# Altium PCB PCI Express_16765X6890_64PIN_Low profile_Clear.PCBDOC (part 6 of 9)
Units mm, origin at the board's own origin, x right, y up, seen from the top; angles counter-clockwise.
Board outline 80.71 x 137.84 mm, 6 copper layers (Top Layer, Layer 2 (GND), Layer 3, Layer 4, Layer 5 (AGND), Bottom Layer), stack 1.571 mm thick; 507 components, 297 nets, 1544 pads, 616 vias.
Unrouted connection lines stored in the file: 101.
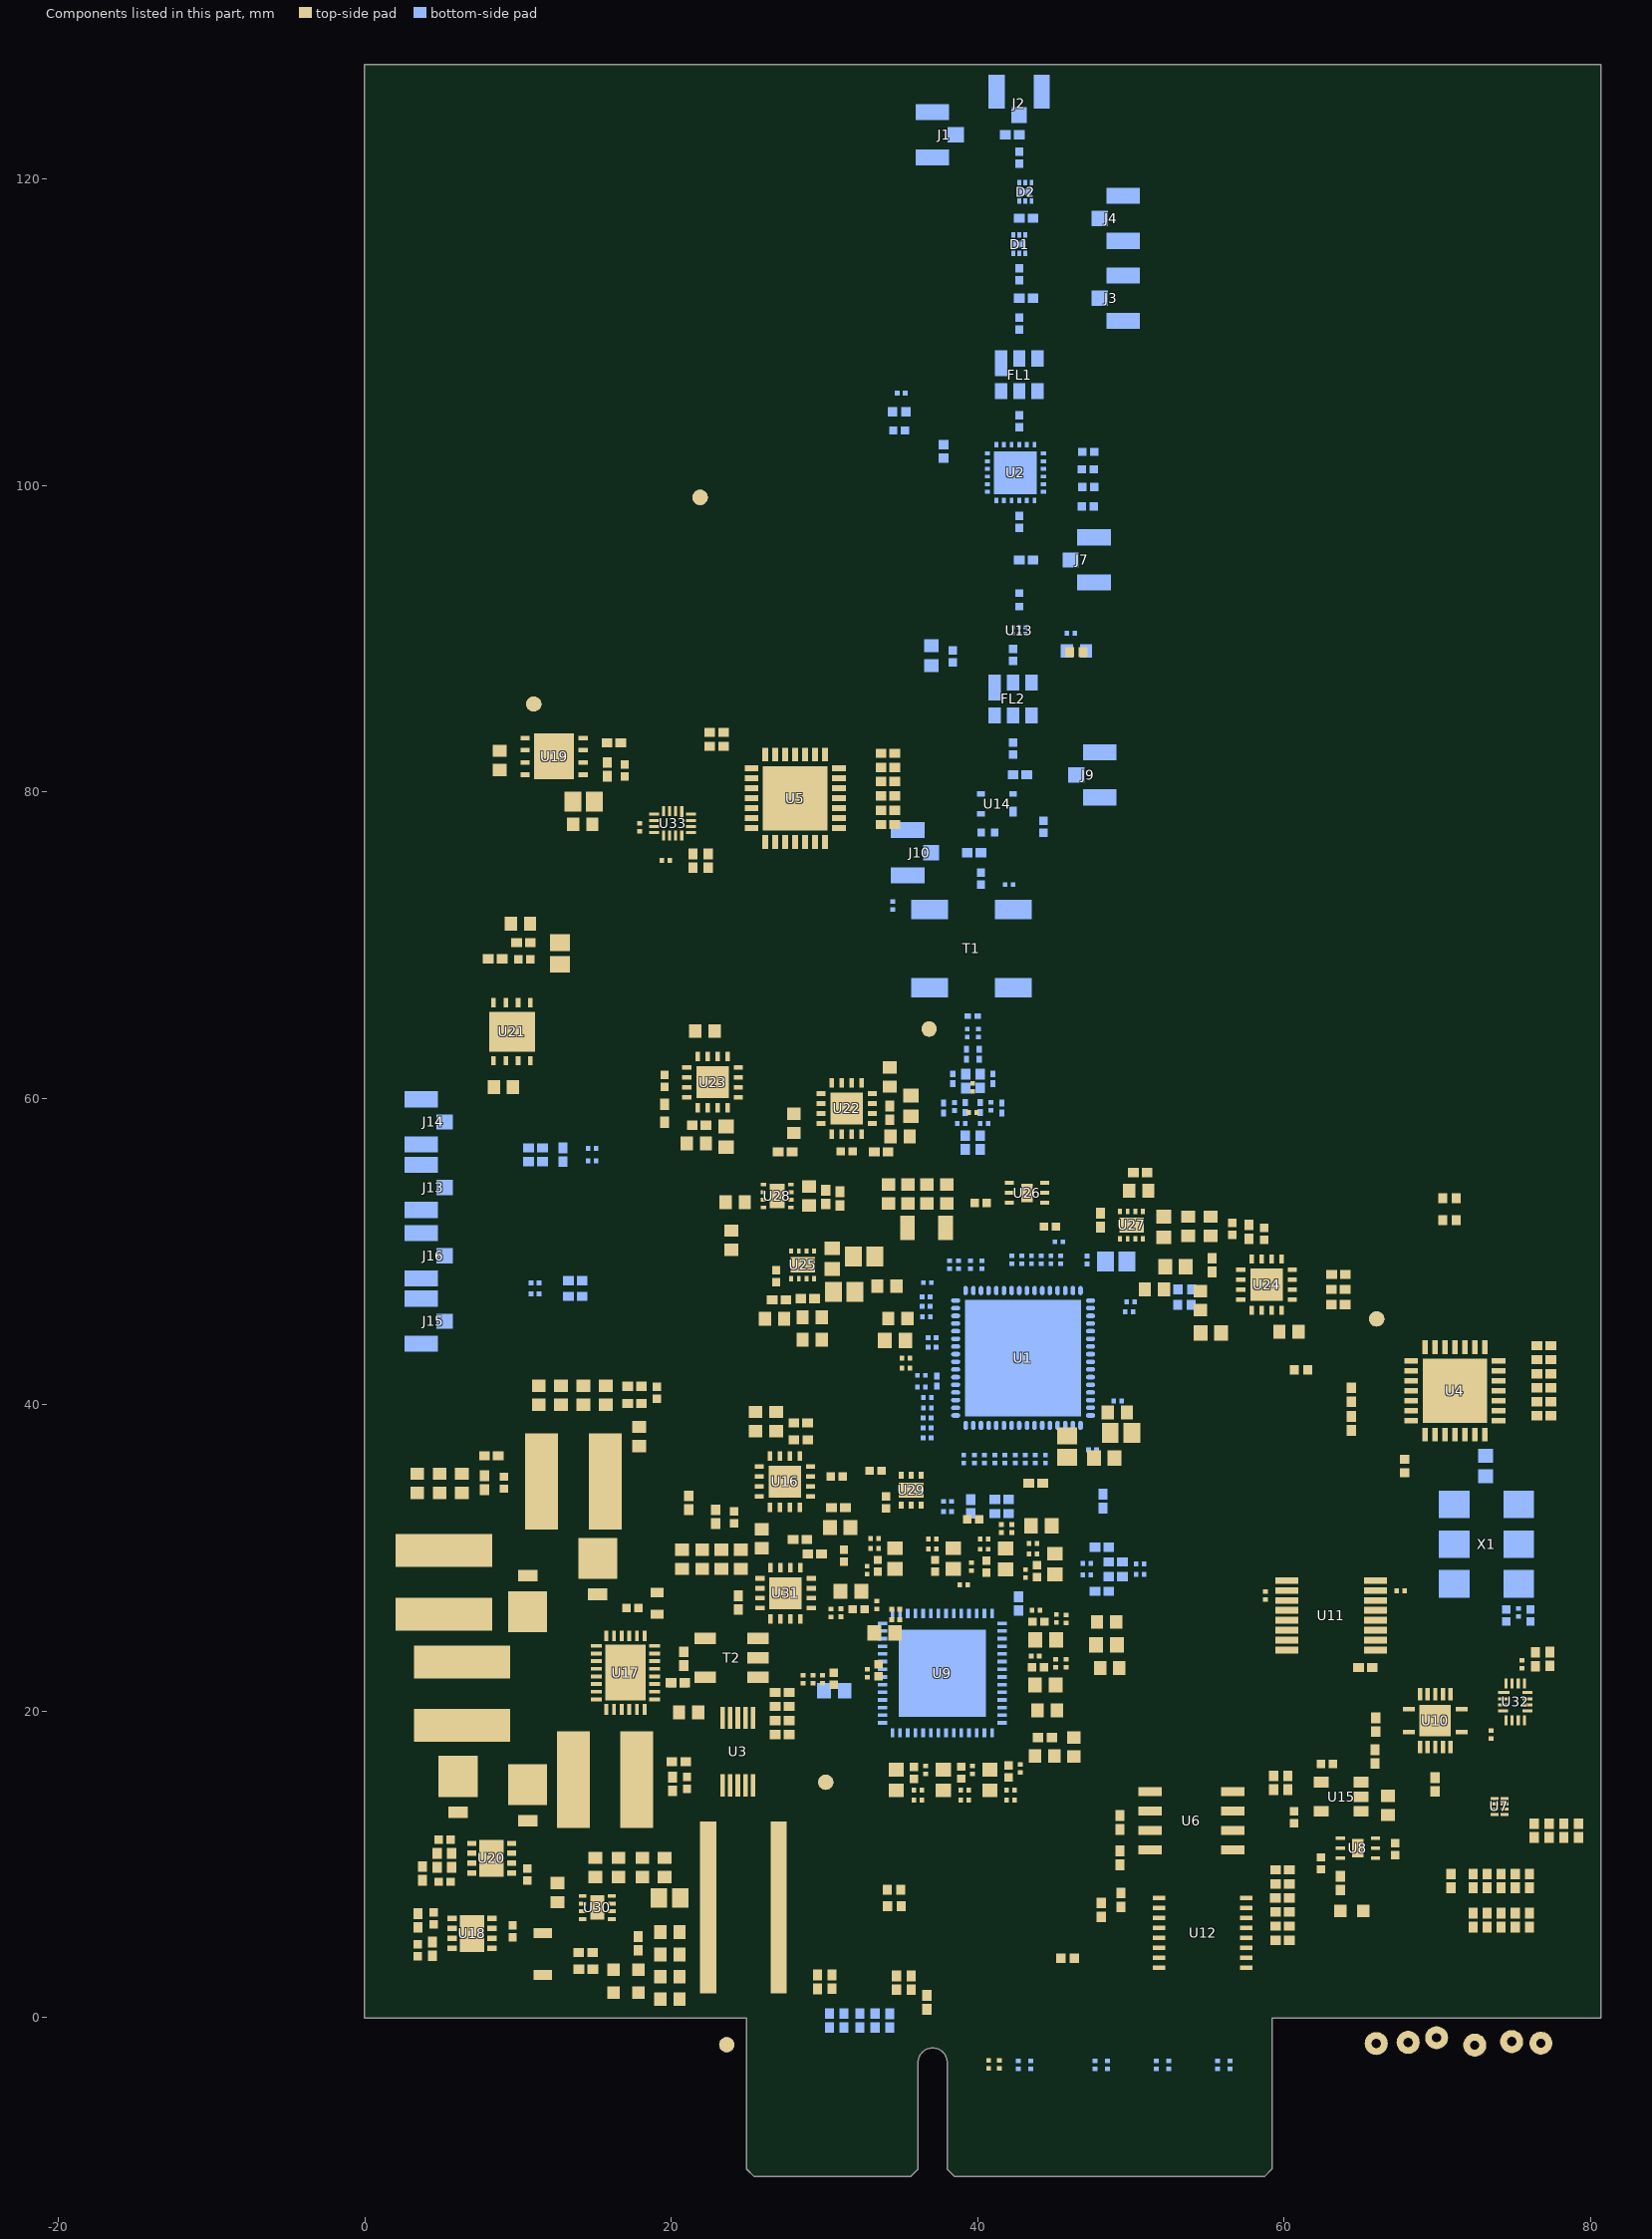
[diagram p4: the components of this part, seen from the top]

## Part data (continued)
U7: "TEXAS INSTRUMENTS   PCA9306DQER.   IC, SMBus, 5V, X2SON-8", Low Level Output Current=128mA, Manufacturer 1="Texas Instruments", Max Operating Temperature=85°C, Max Supply Voltage=5V, Min Operating Temperature=-40°C, Min Supply Voltage=0uV, Package Quantity=1, Supplier Part Number 1=296-27957-1-ND, ComponentLink1Description=https://datasheet.ciiva.com/22631/1719693-22631024.pdf?src-supplier=Element14, ComponentLink1URL=https://datasheet.ciiva.com/22631/1719693-22631024.pdf?src-supplier=Element14, ComponentLink2Description=https://datasheet.ciiva.com/1899/pca9306-1899328.pdf?src-supplier=Digi-Key, ComponentLink2URL=https://datasheet.ciiva.com/1899/pca9306-1899328.pdf?src-supplier=Digi-Key, ComponentLink3Description=https://datasheet.ciiva.com/15095/getdatasheetpartid-306496-15095555.pdf?src-supplier=Verical, ComponentLink3URL=https://datasheet.ciiva.com/15095/getdatasheetpartid-306496-15095555.pdf?src-supplier=Verical, ComponentLink4Description=https://datasheet.ciiva.com/1504/1862428-1504149.pdf?src-supplier=Element14, ComponentLink4URL=https://datasheet.ciiva.com/1504/1862428-1504149.pdf?src-supplier=Element14, ComponentLink5Description=https://datasheet.ciiva.com/1899/pca9306-1899326.pdf?src-supplier=Digi-Key, ComponentLink5URL=https://datasheet.ciiva.com/1899/pca9306-1899326.pdf?src-supplier=Digi-Key, ComponentLink6Description=https://datasheet.ciiva.com/14287/pca9306-14287374.pdf?src-supplier=Avnet, ComponentLink6URL=https://datasheet.ciiva.com/14287/pca9306-14287374.pdf?src-supplier=Avnet, ComponentLink7Description=https://datasheet.ciiva.com/14287/pca9306-14287470.pdf?src-supplier=Avnet, ComponentLink7URL=https://datasheet.ciiva.com/14287/pca9306-14287470.pdf?src-supplier=Avnet, ComponentLink8Description=https://datasheet.ciiva.com/1899/pca9306-1899327.pdf?src-supplier=Digi-Key, ComponentLink8URL=https://datasheet.ciiva.com/1899/pca9306-1899327.pdf?src-supplier=Digi-Key, ComponentLink9Description=https://datasheet.ciiva.com/26041/pca9306-26041014.pdf?src-supplier=Avnet+Europe, ComponentLink9URL=https://datasheet.ciiva.com/26041/pca9306-26041014.pdf?src-supplier=Avnet+Europe, Height=0.35mm, Lead Free="Lead Free", Length=1.45mm, Logic Function=Translator, Manufacturer Part Number 1=PCA9306DQER, Number of Bits=2, Number of Channels=2, Number of Outputs=2, Number of Pins=8, Output Type=I2C, Packaging="Tape and Reel", Pricing 1="1=0,67000, 10=0,59100, 100=0,45340, 500=0,35844, 1000=0,28675 (USD)", Propagation Delay=0.3ns, Radiation Hardening=No, REACH SVHC="No SVHC", RoHS=Yes, Stock 1=25002, Supplier 1=Digi-Key, Turn-On Delay Time=1.4ns, Width=1.05mm
U8 U26: "Ultra Low Noise, 150MA Linear Regulator For Rf/analog Circuits, 6 Pin Llp", Dropout Voltage=150mV, Manufacturer 1="Texas Instruments", Max Input Voltage=5.5V, Max Operating Temperature=125°C, Max Output Current=150mA, Min Input Voltage=2.5V, Min Operating Temperature=-40°C, Nominal Output Voltage=1.8V, Output Voltage Accuracy=2%, Package Quantity=1000, Quiescent Current=50uA, Supplier Part Number 1=LP5900SD-1.8/NOPBCT-ND, Accuracy=2%, ComponentLink1Description=https://datasheet.ciiva.com/6598/lp5900-6598182.pdf?src-supplier=Digi-Key, ComponentLink1URL=https://datasheet.ciiva.com/6598/lp5900-6598182.pdf?src-supplier=Digi-Key, ComponentLink2Description=https://datasheet.ciiva.com/6598/lp5900-6598185.pdf?src-supplier=Digi-Key, ComponentLink2URL=https://datasheet.ciiva.com/6598/lp5900-6598185.pdf?src-supplier=Digi-Key, ComponentLink3Description=https://datasheet.ciiva.com/26175/lp5900-26175289.pdf?src-supplier=Avnet+Europe, ComponentLink3URL=https://datasheet.ciiva.com/26175/lp5900-26175289.pdf?src-supplier=Avnet+Europe, ComponentLink4Description=https://datasheet.ciiva.com/6598/lp5900-6598187.pdf?src-supplier=Digi-Key, ComponentLink4URL=https://datasheet.ciiva.com/6598/lp5900-6598187.pdf?src-supplier=Digi-Key, ComponentLink5Description=https://datasheet.ciiva.com/28643/1772310-28643116.pdf?src-supplier=Element14, ComponentLink5URL=https://datasheet.ciiva.com/28643/1772310-28643116.pdf?src-supplier=Element14, ComponentLink6Description=https://datasheet.ciiva.com/14278/lp5900-14278125.pdf?src-supplier=Avnet, ComponentLink6URL=https://datasheet.ciiva.com/14278/lp5900-14278125.pdf?src-supplier=Avnet, ComponentLink7Description=https://datasheet.ciiva.com/22678/1772310-22678013.pdf?src-supplier=Element14, ComponentLink7URL=https://datasheet.ciiva.com/22678/1772310-22678013.pdf?src-supplier=Element14, Height=0.8mm, Lead Free="Lead Free", Length=2.2mm, Manufacturer Part Number 1=LP5900SD-1.8/NOPB, Mount="Surface Mount", Number of Outputs=1, Number of Pins=6, Output Current=150mA, Output Type=Fixed, Output Voltage=1.8V, Packaging="Tape and Reel", Polarity=Positive, Pricing 1="1=0.77000, 10=0.68000, 100=0.52120, 500=0.41200 (USD)", Radiation Hardening=No, REACH SVHC="No SVHC", RoHS=Yes, Stock 1=10846, Supplier 1=Digi-Key, Width=2.5mm
U9: Manufacturer="Texas Instruments", Max Operating Temperature=85°C, Min Operating Temperature=-40°C, Supplier Part Number 1=296-51339-1-ND, Manufacturer Part Number=LMK04610RTQR, Number of Inputs=2, Number of Outputs=10, Pricing 1="1 = 20,47000, 10 = 18,87700, 100 = 16,11940, 500 = 14,63474 (USD)", RoHS=No, Stock 1=2022, Supplier 1=Digi-Key
U10: "level shifter Automotive 14-Pin VQFN EP T/R", Case/Package=VQFN, High Level Output Current=16mA, Manufacturer 1="Texas Instruments", Max Operating Temperature=125°C, Min Operating Temperature=-40°C, Quiescent Current=2uA, Supplier Part Number 1=296-40546-1-ND, ComponentLink1Description=https://datasheet.ciiva.com/48438/sn74lv4t125-48438269.pdf?src-supplier=Avnet, ComponentLink1URL=https://datasheet.ciiva.com/48438/sn74lv4t125-48438269.pdf?src-supplier=Avnet, Contact Plating=Gold, Lead Free="Lead Free", Logic Function=Buffer,Inverting,Translator, Low Level Output Current=16mA, Manufacturer Part Number 1=SN74LV4T125RGYR, Mount="Surface Mount", Number of Bits=4, Number of Bits per Element=1, Number of Elements=4, Number of Pins=14, Packaging="Tape and Reel", Pricing 1="1=1.15000, 10=1.03000, 100=0.80310, 500=0.66342, 1000=0.52376 (USD)", Radiation Hardening=No, RoHS=Yes, Stock 1=74112, Supplier 1=Digi-Key
U11: Manufacturer 1="Texas Instruments", Supplier Part Number 1=296-SN74AXC4T774PWRCT-ND, Manufacturer Part Number 1=SN74AXC4T774PWR, Pricing 1="1=1,14000, 10=1,01500, 100=0,79120, 500=0,65364, 1000=0,51603 (USD)", RoHS=No, Stock 1=2000, Supplier 1=Digi-Key
U12: "IC BRIDGE SPI/I2C 16TSSOP", Manufacturer 1="NXP Semiconductors", Supplier Part Number 1=568-13691-1-ND, ComponentLink1Description=https://www.nxp.com/docs/en/data-sheet/SC18IS602B.pdf?src-supplier=Digi-Key, ComponentLink1URL=https://www.nxp.com/docs/en/data-sheet/SC18IS602B.pdf?src-supplier=Digi-Key, Manufacturer Part Number 1=SC18IS602BIPW/S8HP, Pricing 1="1=2.76000, 10=2.47600, 100=2.02860, 500=1.72690, 1000=1.45642 (USD)", RoHS=No, Stock 1=121, Supplier 1=Digi-Key
U13: Operating Frequency="1550 - 1615 MHz", Supplier Part Number 1=BGA524N6E6327XTSA1DKR-ND, Gain="16,6 dBm", Part Number=BGA524N6, Supplier 1=Digi-Key, URL=https://www.infineon.com/dgdl/Infineon-BGA524N6-DS-v03_00-en.pdf?fileId=db3a304344e406b50144e44dfad302b9
U14: Frequency="DC - 3.5GHz", Supplier Part Number 1=BGA616H6327XTSA1CT-ND, Supplier 1=Digi-Key
U15: "IC REG LINEAR 3.3V 300MA SOT23-5", Case/Package=SOT-23-5, Dropout Voltage=250mV, Manufacturer 1=Diodes, Max Input Voltage=13.2V, Max Operating Temperature=125°C, Max Output Current=300mA, Min Input Voltage=2.5V, Min Operating Temperature=-40°C, Output Voltage=3.3V, Package Quantity=1, Power Supply Rejection Ratio (PSRR)=75dB, Quiescent Current=150uA, Supplier Part Number 1=AP2210K-3.3TRG1DICT-ND, Accuracy=1%, ComponentLink1Description=http://www.mouser.com/ds/2/115/AP2210-271459.pdf?src-supplier=Mouser, ComponentLink1URL=http://www.mouser.com/ds/2/115/AP2210-271459.pdf?src-supplier=Mouser, ComponentLink2Description=http://www.alliedelec.com/m/d/24500b427815944890653ed70b5a0b32.pdf?src-supplier=Allied+Electronics, ComponentLink2URL=http://www.alliedelec.com/m/d/24500b427815944890653ed70b5a0b32.pdf?src-supplier=Allied+Electronics, ComponentLink3Description=https://www.diodes.com/assets/Datasheets/AP2210.pdf?src-supplier=Digi-Key, ComponentLink3URL=https://www.diodes.com/assets/Datasheets/AP2210.pdf?src-supplier=Digi-Key, ComponentLink4Description=http://www.diodes.com/datasheets/AP2210.pdf?src-supplier=Avnet, ComponentLink4URL=http://www.diodes.com/datasheets/AP2210.pdf?src-supplier=Avnet, Height=1.3mm, Lead Free="Lead Free", Length=3.02mm, Manufacturer Part Number 1=AP2210K-3.3TRG1, Mount="Surface Mount", Number of Outputs=1, Number of Pins=5, Number of Regulators=1, Output Current=300mA, Output Type=Fixed, Packaging="Tape and Reel", Polarity=Positive, Pricing 1="1=0.42000, 10=0.31700, 100=0.19730, 500=0.13496, 1000=0.10382 (USD)", Radiation Hardening=No, RoHS=Yes, Stock 1=89118, Supplier 1=Digi-Key, Weight=0.001058oz, Width=1.7mm
U16 U22 U23 U24: "IC REG LIN POS ADJ 2A 16LFCSP", Case/Package="LFCSP EP", Dropout Voltage=160mV, Manufacturer="Analog Devices", Max Input Voltage=3.6V, Max Operating Temperature=125°C, Max Output Current=2A, Max Output Voltage=3V, Max Supply Current=1.8mA, Min Current Limit=2.4A, Min Input Voltage=1.6V, Min Operating Temperature=-40°C, Min Output Voltage=750mV, Output Voltage Accuracy=1%, Power Supply Rejection Ratio (PSRR)=70dB, Supplier Part Number 1=ADP1741ACPZ-R7CT-ND, Accuracy=1%, ComponentLink1Description=https://datasheet.ciiva.com/2041/adp1740-1741-2041344.pdf?src-supplier=Digi-Key, ComponentLink1URL=https://datasheet.ciiva.com/2041/adp1740-1741-2041344.pdf?src-supplier=Digi-Key, ComponentLink2Description=https://datasheet.ciiva.com/15364/adp1740-1741-259394-15364336.pdf?src-supplier=Mouser, ComponentLink2URL=https://datasheet.ciiva.com/15364/adp1740-1741-259394-15364336.pdf?src-supplier=Mouser, ComponentLink3Description=https://datasheet.ciiva.com/23604/697190-23604608.pdf?src-supplier=Newark, ComponentLink3URL=https://datasheet.ciiva.com/23604/697190-23604608.pdf?src-supplier=Newark, ComponentLink4Description=https://datasheet.ciiva.com/2041/adp1740-1741-2041345.pdf?src-supplier=Digi-Key, ComponentLink4URL=https://datasheet.ciiva.com/2041/adp1740-1741-2041345.pdf?src-supplier=Digi-Key, ComponentLink5Description=https://datasheet.ciiva.com/3224/adp1740-1741-3224694.pdf?src-supplier=Avnet, ComponentLink5URL=https://datasheet.ciiva.com/3224/adp1740-1741-3224694.pdf?src-supplier=Avnet, ComponentLink6Description=https://datasheet.ciiva.com/17365/adp1740-1741-17365261.pdf?src-supplier=Avnet+Europe, ComponentLink6URL=https://datasheet.ciiva.com/17365/adp1740-1741-17365261.pdf?src-supplier=Avnet+Europe, ComponentLink7Description=https://datasheet.ciiva.com/2041/adp1740-1741-2041343.pdf?src-supplier=Digi-Key, ComponentLink7URL=https://datasheet.ciiva.com/2041/adp1740-1741-2041343.pdf?src-supplier=Digi-Key, Lead Free="Contains Lead", Manufacturer Part Number=ADP1741ACPZ-R7, Number of Outputs=1, Number of Pins=16, Number of Regulators=1, Operating Supply Current=1.8mA, Output Current=2A, Output Type=Adjustable, Output Voltage=3V, Packaging="Tape and Reel", Polarity=Positive, Pricing 1="1 = 3,42000, 10 = 3,07000, 25 = 2,90240, 100 = 2,51540, 250 = 2,38644, 500 = 2,14136 (USD)", Radiation Hardening=No, REACH SVHC="No SVHC", RoHS=Yes, Stock 1=7057, Supplier 1=Digi-Key
U17: "LINEAR TECHNOLOGY         LT3504EUFD#PBF             BUCK, QUAD, 3.2/40V, 1A, 2.2MHZ, 28QFN", Case/Package=QFN, Current - Output 1=1A, Manufacturer="Analog Devices / Linear Technology", Max Operating Temperature=125°C, Min Input Voltage=3.2V, Min Operating Temperature=-40°C, Output Voltage=40V, Package Quantity=73, Supplier Part Number 1=LT3504EUFD#PBF-ND, Switching Frequency=2.1MHz, ComponentLink1Description=https://datasheet.ciiva.com/6192/1732075-6192640.pdf?src-supplier=Farnell, ComponentLink1URL=https://datasheet.ciiva.com/6192/1732075-6192640.pdf?src-supplier=Farnell, ComponentLink2Description=https://datasheet.ciiva.com/7363/1732075-7363817.pdf?src-supplier=Newark, ComponentLink2URL=https://datasheet.ciiva.com/7363/1732075-7363817.pdf?src-supplier=Newark, Current - Output 2=1A, Lead Free="Lead Free", Manufacturer Part Number=LT3504EUFD#PBF, Number of Outputs=4, Number of Pins=28, Output Current=1A, Output Type=Adjustable, Packaging=Rail/Tube, Pricing 1="1 = 8,49000, 25 = 5,63840, 100 = 4,66200, 250 = 4,42892, 500 = 4,32900 (USD)", REACH SVHC="No SVHC", RoHS=Yes, Stock 1=1751, Supplier 1=Digi-Key, Synchronous Rectifier=No, Voltage - Output 1=40V, Voltage - Output 2=40V
U18 U20: "IC REG LDO ADJ 1.5A 8DFN", Case/Package=DFN, Dropout Voltage=330mV, Input Bias Current=120uA, Manufacturer 1=Microchip, Max Input Voltage=6V, Max Operating Temperature=125°C, Max Output Current=1.5A, Min Input Voltage=2.3V, Min Operating Temperature=-40°C, Output Voltage=5V, Package Quantity=3300, Reference Voltage=410mV, Supplier Part Number 1=MCP1727T-ADJE/MFCT-ND, Accuracy=0.5%, ComponentLink1Description=https://datasheet.ciiva.com/2057/21999b-2057048.pdf?src-supplier=Digi-Key, ComponentLink1URL=https://datasheet.ciiva.com/2057/21999b-2057048.pdf?src-supplier=Digi-Key, ComponentLink2Description=https://datasheet.ciiva.com/8237/jp027822-8237704.pdf?src-supplier=Avnet, ComponentLink2URL=https://datasheet.ciiva.com/8237/jp027822-8237704.pdf?src-supplier=Avnet, ComponentLink3Description=https://datasheet.ciiva.com/17364/jp027822-17364137.pdf?src-supplier=Avnet+Europe, ComponentLink3URL=https://datasheet.ciiva.com/17364/jp027822-17364137.pdf?src-supplier=Avnet+Europe, Contact Plating=Tin,Matte, Lead Free="Lead Free", Manufacturer Part Number 1=MCP1727T-ADJE/MF, Mount="Surface Mount", Number of Outputs=1, Output Current=1.5A, Output Type=Adjustable, Packaging="Tape and Reel", Polarity=Positive, Pricing 1="1=0.84000, 25=0.71080, 100=0.63860 (USD)", Quiescent Current=120uA, Radiation Hardening=No, RoHS=Yes, Stock 1=9419, Supplier 1=Digi-Key
U19 U21: "Low Dropout Regulators - LDO Micropower 800mA Low Noise Adj Vltg Reg", Dropout Voltage=475mV, Manufacturer 1="Texas Instruments", Max Input Voltage=16V, Max Operating Temperature=125°C, Max Output Current=800mA, Max Output Voltage=5.5V, Min Input Voltage=2.5V, Min Operating Temperature=-40°C, Min Output Voltage=1V, Output Voltage Accuracy=1%, Package Quantity=1000, Quiescent Current=5.5mA, Supplier Part Number 1=LP3878SD-ADJ/NOPBCT-ND, Accuracy=1%, ComponentLink1Description=https://datasheet.ciiva.com/27052/1329588-27052012.pdf?src-supplier=Jameco, ComponentLink1URL=https://datasheet.ciiva.com/27052/1329588-27052012.pdf?src-supplier=Jameco, ComponentLink2Description=https://datasheet.ciiva.com/1571/1846896-1571038.pdf?src-supplier=Farnell, ComponentLink2URL=https://datasheet.ciiva.com/1571/1846896-1571038.pdf?src-supplier=Farnell, ComponentLink3Description=https://datasheet.ciiva.com/7992/1814893-7992723.pdf?src-supplier=Element14, ComponentLink3URL=https://datasheet.ciiva.com/7992/1814893-7992723.pdf?src-supplier=Element14, ComponentLink4Description=https://datasheet.ciiva.com/25626/0900766b810fa759-25626986.pdf?src-supplier=RSComponents, ComponentLink4URL=https://datasheet.ciiva.com/25626/0900766b810fa759-25626986.pdf?src-supplier=RSComponents, ComponentLink5Description=https://datasheet.ciiva.com/6595/lp3878-adj-6595783.pdf?src-supplier=Digi-Key, ComponentLink5URL=https://datasheet.ciiva.com/6595/lp3878-adj-6595783.pdf?src-supplier=Digi-Key, ComponentLink6Description=https://datasheet.ciiva.com/25974/lp3878-adj-25974985.pdf?src-supplier=Avnet+Europe, ComponentLink6URL=https://datasheet.ciiva.com/25974/lp3878-adj-25974985.pdf?src-supplier=Avnet+Europe, ComponentLink7Description=https://datasheet.ciiva.com/3223/lp3878-adj-3223946.pdf?src-supplier=Avnet, ComponentLink7URL=https://datasheet.ciiva.com/3223/lp3878-adj-3223946.pdf?src-supplier=Avnet, ComponentLink8Description=https://datasheet.ciiva.com/6595/lp3878-adj-6595786.pdf?src-supplier=Digi-Key, ComponentLink8URL=https://datasheet.ciiva.com/6595/lp3878-adj-6595786.pdf?src-supplier=Digi-Key, ComponentLink9Description=https://datasheet.ciiva.com/46419/lp3878-adj-46419375.pdf?src-supplier=Element14, ComponentLink9URL=https://datasheet.ciiva.com/46419/lp3878-adj-46419375.pdf?src-supplier=Element14, Contact Plating=Tin,Matte, Height=0.8mm, Lead Free="Lead Free", Length=4mm, Manufacturer Part Number 1=LP3878SD-ADJ/NOPB, Mount="Surface Mount", Number of Outputs=1, Number of Pins=8, Number of Regulators=1, Output Current=800mA, Output Type=Adjustable, Output Voltage=5.5V, Packaging="Tape and Reel", Polarity=Positive, Pricing 1="1=2.14000, 10=1.92200, 100=1.54450, 500=1.26896 (USD)", Radiation Hardening=No, REACH SVHC="No SVHC", RoHS=Yes, Stock 1=29951, Supplier 1=Digi-Key, Width=4mm
U25 U27 U28: "IC REG LIN POS ADJ 500MA 8LFCSP", Case/Package=MSOP, Dropout Voltage=130mV, Manufacturer="Analog Devices", Max Input Voltage=5.5V, Max Operating Temperature=125°C, Max Output Current=500mA, Max Output Voltage=5V, Max Supply Current=210uA, Min Current Limit=550mA, Min Input Voltage=2.3V, Min Operating Temperature=-40°C, Min Output Voltage=800mV, Nominal Supply Current=45uA, Power Supply Rejection Ratio (PSRR)=60dB, Reference Voltage=500mV, Supplier Part Number 1=2457144, Accuracy=1%, ComponentLink1Description=https://datasheet.ciiva.com/17365/adp124-125-17365589.pdf?src-supplier=Avnet+Europe, ComponentLink1URL=https://datasheet.ciiva.com/17365/adp124-125-17365589.pdf?src-supplier=Avnet+Europe, ComponentLink2Description=https://datasheet.ciiva.com/2056/adp124-125-2056955.pdf?src-supplier=Digi-Key, ComponentLink2URL=https://datasheet.ciiva.com/2056/adp124-125-2056955.pdf?src-supplier=Digi-Key, ComponentLink3Description=https://datasheet.ciiva.com/2056/adp124-125-2056954.pdf?src-supplier=Digi-Key, ComponentLink3URL=https://datasheet.ciiva.com/2056/adp124-125-2056954.pdf?src-supplier=Digi-Key, ComponentLink4Description=https://datasheet.ciiva.com/2056/adp124-125-2056956.pdf?src-supplier=Digi-Key, ComponentLink4URL=https://datasheet.ciiva.com/2056/adp124-125-2056956.pdf?src-supplier=Digi-Key, ComponentLink5Description=https://datasheet.ciiva.com/48694/001251247-da-01-en-ic-reg-l-adj-adp125acpz-r7-lfcspud-8-adi-48694599.pdf?src-supplier=Conrad, ComponentLink5URL=https://datasheet.ciiva.com/48694/001251247-da-01-en-ic-reg-l-adj-adp125acpz-r7-lfcspud-8-adi-48694599.pdf?src-supplier=Conrad, ComponentLink6Description=http://datasheet.octopart.com/ADP125ACPZ-R7-Analog-Devices-datasheet-11525030.pdf?src-supplier=Newark, ComponentLink6URL=http://datasheet.octopart.com/ADP125ACPZ-R7-Analog-Devices-datasheet-11525030.pdf?src-supplier=Newark, ComponentLink7Description=http://datasheet.octopart.com/ADP125ACPZ-R7-Analog-Devices-datasheet-38878834.pdf?src-supplier=Newark, ComponentLink7URL=http://datasheet.octopart.com/ADP125ACPZ-R7-Analog-Devices-datasheet-38878834.pdf?src-supplier=Newark, ComponentLink8Description=http://datasheet.octopart.com/ADP125ACPZ-R7-Analog-Devices-datasheet-10623001.pdf?src-supplier=Analog+Devices, ComponentLink8URL=http://datasheet.octopart.com/ADP125ACPZ-R7-Analog-Devices-datasheet-10623001.pdf?src-supplier=Analog+Devices, ComponentLink9Description=http://datasheet.octopart.com/ADP125ACPZ-R7-Analog-Devices-datasheet-8638579.pdf?src-supplier=Analog+Devices, ComponentLink9URL=http://datasheet.octopart.com/ADP125ACPZ-R7-Analog-Devices-datasheet-8638579.pdf?src-supplier=Analog+Devices, ComponentLink10Description=http://datasheet.octopart.com/ADP125ACPZ-R7-Analog-Devices-datasheet-11776558.pdf?src-supplier=Arrow, ComponentLink10URL=http://datasheet.octopart.com/ADP125ACPZ-R7-Analog-Devices-datasheet-11776558.pdf?src-supplier=Arrow, Contact Plating=Gold, Height=0.6mm, Lead Free="Contains Lead", Length=2mm, Manufacturer 2="Analog Devices", Manufacturer Part Number=ADP125ACPZ-R7, Manufacturer Part Number 2=ADP125ACPZ-R7, Number of Outputs=1, Number of Pins=8, Number of Regulators=1, Operating Supply Current=45uA, Output Current=500mA, Output Type=Adjustable, Output Voltage=5V, Packaging="Tape and Reel", Polarity=Positive, Pricing 2="1=1.39000, 10=1.23900, 25=1.17600, 100=0.96600, 250=0.90300, 500=0.79800, 1000=0.63000 (USD)", Quiescent Current=45uA, REACH SVHC="No SVHC", RoHS=Yes, Stock 1=261, Stock 2=12322, Supplier 1=Farnell, Supplier 2=Digi-Key, Supplier Part Number 2=ADP125ACPZ-R7CT-ND, Width=2mm
U29: "TEXAS INSTRUMENTS         TPS7A3501DRVT            LDO Voltage Regulator, Adjustable, 1.71V to 5V in, 330mV drop, 1.21V to 4.5V/1A out, SON-6", Dropout Voltage=330mV, Manufacturer="Texas Instruments", Max Input Voltage=5V, Max Operating Temperature=125°C, Max Output Current=1A, Max Output Voltage=4.5V, Min Current Limit=1.1A, Min Input Voltage=1.71V, Min Operating Temperature=-40°C, Min Output Voltage=1.21V, Package Quantity=250, Quiescent Current=2.2mA, Supplier Part Number 1=296-37133-1-ND, ComponentLink1Description=https://datasheet.ciiva.com/28435/1776766-28435910.pdf?src-supplier=Element14, ComponentLink1URL=https://datasheet.ciiva.com/28435/1776766-28435910.pdf?src-supplier=Element14, ComponentLink2Description=https://datasheet.ciiva.com/29569/tps7a3501-29569542.pdf?src-supplier=Digi-Key, ComponentLink2URL=https://datasheet.ciiva.com/29569/tps7a3501-29569542.pdf?src-supplier=Digi-Key, ComponentLink3Description=https://datasheet.ciiva.com/29569/tps7a3501-29569543.pdf?src-supplier=Digi-Key, ComponentLink3URL=https://datasheet.ciiva.com/29569/tps7a3501-29569543.pdf?src-supplier=Digi-Key, ComponentLink4Description=https://datasheet.ciiva.com/29569/tps7a3501-29569544.pdf?src-supplier=Digi-Key, ComponentLink4URL=https://datasheet.ciiva.com/29569/tps7a3501-29569544.pdf?src-supplier=Digi-Key, ComponentLink5Description=https://datasheet.ciiva.com/30016/tps7a3501-30016008.pdf?src-supplier=Avnet, ComponentLink5URL=https://datasheet.ciiva.com/30016/tps7a3501-30016008.pdf?src-supplier=Avnet, Lead Free="Lead Free", Manufacturer Part Number=TPS7A3501DRVT, Mount="Surface Mount", Number of Outputs=1, Number of Pins=6, Number of Regulators=1, Output Current=1A, Output Type=Adjustable, Output Voltage=4.5V, Packaging="Tape and Reel", Polarity=Positive, Pricing 1="1 = 2,31000, 10 = 2,07200, 100 = 1,66520 (USD)", Radiation Hardening=No, REACH SVHC="No SVHC", RoHS=Yes, Stock 1=4410, Supplier 1=Digi-Key, Weight=0.000342oz
U30: "IC REG BUCK 5V 1A SYNC 8WSON", Case/Package=SOIC, Manufacturer 1="Texas Instruments", Max Input Voltage=17V, Max Operating Temperature=125°C, Max Output Current=1A, Max Output Voltage=5V, Min Input Voltage=3V, Min Operating Temperature=-40°C, Package Quantity=1, Quiescent Current=17uA, Supplier Part Number 1=296-29898-1-ND, Switching Frequency=2.25MHz, ComponentLink1Description=https://datasheet.ciiva.com/4880/slvsam2a-198231-4880752.pdf?src-supplier=Mouser, ComponentLink1URL=https://datasheet.ciiva.com/4880/slvsam2a-198231-4880752.pdf?src-supplier=Mouser, ComponentLink2Description=https://datasheet.ciiva.com/2034/tps62160-2034672.pdf?src-supplier=Digi-Key, ComponentLink2URL=https://datasheet.ciiva.com/2034/tps62160-2034672.pdf?src-supplier=Digi-Key, ComponentLink3Description=https://datasheet.ciiva.com/2034/tps62160-2034673.pdf?src-supplier=Digi-Key, ComponentLink3URL=https://datasheet.ciiva.com/2034/tps62160-2034673.pdf?src-supplier=Digi-Key, ComponentLink4Description=https://datasheet.ciiva.com/2034/tps62160-2034674.pdf?src-supplier=Digi-Key, ComponentLink4URL=https://datasheet.ciiva.com/2034/tps62160-2034674.pdf?src-supplier=Digi-Key, Contact Plating=Gold, Lead Free="Lead Free", Manufacturer Part Number 1=TPS62163DSGR, Min Output Voltage=5V, Number of Outputs=1, Number of Pins=8, Operating Supply Voltage=17V, Output Configuration=Positive, Output Current=1A, Output Type=Fixed, Output Voltage=5V, Packaging="Tape and Reel", Pricing 1="1=1.79000, 10=1.61000, 100=1.29440, 500=1.06348, 1000=0.88117 (USD)", REACH SVHC="No SVHC", RoHS=Yes, Stock 1=19908, Supplier 1=Digi-Key, Synchronous Rectifier=Yes
U31: "IC REG LIN POS ADJ 800MA 16LFCSP", Case/Package="LFCSP EP", Dropout Voltage=70mV, Manufacturer="Analog Devices", Max Input Voltage=3.6V, Max Operating Temperature=125°C, Max Output Current=800mA, Max Output Voltage=3V, Max Supply Current=1.4mA, Min Current Limit=1A, Min Input Voltage=1.6V, Min Operating Temperature=-40°C, Min Output Voltage=750mV, Power Supply Rejection Ratio (PSRR)=65dB, Supplier Part Number 1=ADP1753ACPZ-R7CT-ND, Accuracy=2%, ComponentLink1Description=https://datasheet.ciiva.com/26908/adp1753acpz-r7-26908167.pdf?src-supplier=IIIC, ComponentLink1URL=https://datasheet.ciiva.com/26908/adp1753acpz-r7-26908167.pdf?src-supplier=IIIC, ComponentLink2Description=https://datasheet.ciiva.com/8241/adp1752-1753-8241910.pdf?src-supplier=Avnet, ComponentLink2URL=https://datasheet.ciiva.com/8241/adp1752-1753-8241910.pdf?src-supplier=Avnet, ComponentLink3Description=https://datasheet.ciiva.com/2041/adp1752-1753-2041241.pdf?src-supplier=Digi-Key, ComponentLink3URL=https://datasheet.ciiva.com/2041/adp1752-1753-2041241.pdf?src-supplier=Digi-Key, ComponentLink4Description=https://datasheet.ciiva.com/2041/adp1752-1753-2041242.pdf?src-supplier=Digi-Key, ComponentLink4URL=https://datasheet.ciiva.com/2041/adp1752-1753-2041242.pdf?src-supplier=Digi-Key, ComponentLink5Description=https://datasheet.ciiva.com/2041/adp1752-1753-2041243.pdf?src-supplier=Digi-Key, ComponentLink5URL=https://datasheet.ciiva.com/2041/adp1752-1753-2041243.pdf?src-supplier=Digi-Key, ComponentLink6Description=https://datasheet.ciiva.com/17365/adp1752-1753-17365277.pdf?src-supplier=Avnet+Europe, ComponentLink6URL=https://datasheet.ciiva.com/17365/adp1752-1753-17365277.pdf?src-supplier=Avnet+Europe, Height=0.83mm, Lead Free="Contains Lead", Length=4mm, Manufacturer Part Number=ADP1753ACPZ-R7, Nominal Supply Current=1.4mA, Number of Outputs=1, Number of Pins=16, Number of Regulators=1, Operating Supply Current=1.4mA, Output Current=800mA, Output Type=Adjustable, Output Voltage=3V, Packaging="Tape and Reel", Polarity=Positive, Pricing 1="1 = 2,85000, 10 = 2,56400, 25 = 2,41880, 100 = 2,06070, 250 = 1,93496, 500 = 1,69308 (USD)", Radiation Hardening=No, REACH SVHC="No SVHC", RoHS=Yes, Stock 1=1570, Supplier 1=Digi-Key, Width=4mm
U32 U33: "IC TRNSLTR BIDIRECTIONAL 16UQFN", High Level Output Current=-20uA, Low Level Output Current=20uA, Manufacturer 1="Texas Instruments", Max Operating Temperature=85°C, Max Supply Voltage=3.6V, Min Operating Temperature=-40°C, Min Supply Voltage=900mV, Nominal Supply Current=5uA, Package Quantity=1, Quiescent Current=10uA, Supplier Part Number 1=296-29681-1-ND, ComponentLink1Description=https://datasheet.ciiva.com/1900/txb0304-1900817.pdf?src-supplier=Digi-Key, ComponentLink1URL=https://datasheet.ciiva.com/1900/txb0304-1900817.pdf?src-supplier=Digi-Key, ComponentLink2Description=https://datasheet.ciiva.com/15096/getdatasheetpartid-490462-15096317.pdf?src-supplier=Verical, ComponentLink2URL=https://datasheet.ciiva.com/15096/getdatasheetpartid-490462-15096317.pdf?src-supplier=Verical, ComponentLink3Description=https://datasheet.ciiva.com/1900/txb0304-1900818.pdf?src-supplier=Digi-Key, ComponentLink3URL=https://datasheet.ciiva.com/1900/txb0304-1900818.pdf?src-supplier=Digi-Key, ComponentLink4Description=https://datasheet.ciiva.com/1900/txb0304-1900819.pdf?src-supplier=Digi-Key, ComponentLink4URL=https://datasheet.ciiva.com/1900/txb0304-1900819.pdf?src-supplier=Digi-Key, ComponentLink5Description=https://datasheet.ciiva.com/14287/txb0304-14287243.pdf?src-supplier=Avnet, ComponentLink5URL=https://datasheet.ciiva.com/14287/txb0304-14287243.pdf?src-supplier=Avnet, Contact Plating=Gold, Data Rate=140Mbps, Lead Free="Lead Free", Logic Function=Translator, Manufacturer Part Number 1=TXB0304RSVR, Mount="Surface Mount", Number of Bits=4, Number of Channels=4, Number of Inputs=4, Number of Outputs=4, Number of Pins=16, Packaging="Tape and Reel", Pricing 1="1=1.45000, 10=1.29700, 100=1.01160, 500=0.83564, 1000=0.65972 (USD)", Propagation Delay=4.8ns, Radiation Hardening=No, REACH SVHC="No SVHC", RoHS=Yes, Stock 1=1758, Supplier 1=Digi-Key, Turn-On Delay Time=18.9ns
X1: "OSC VCXO 122.88MHZ LVPECL SMD", Case/Package=SMD/SMT, Frequency=122.88MHz, Manufacturer=Epson, Max Operating Temperature=85°C, Max Supply Current=65mA, Min Operating Temperature=-40°C, Supplier Part Number 1=SER3907CT-ND, ComponentLink1Description=https://datasheet.ciiva.com/29626/vg-4513ca-partnumber-29626986.pdf?src-supplier=Digi-Key, ComponentLink1URL=https://datasheet.ciiva.com/29626/vg-4513ca-partnumber-29626986.pdf?src-supplier=Digi-Key, ComponentLink2Description=https://datasheet.ciiva.com/29626/vg-4513ca-partnumber-29626987.pdf?src-supplier=Digi-Key, ComponentLink2URL=https://datasheet.ciiva.com/29626/vg-4513ca-partnumber-29626987.pdf?src-supplier=Digi-Key, ComponentLink3Description=https://datasheet.ciiva.com/29626/076-vg-4513ca-cb-e13ya-29626988.pdf?src-supplier=Digi-Key, ComponentLink3URL=https://datasheet.ciiva.com/29626/076-vg-4513ca-cb-e13ya-29626988.pdf?src-supplier=Digi-Key, Height=0.071inch, Lead Free="Lead Free", Length=0.276inch, Manufacturer Part Number=VG-4513CA122.8800M-GFCT3, Mount="Surface Mount", Packaging="Tape and Reel", Pricing 1="1 = 9,91000, 10 = 9,29000, 50 = 8,97980, 100 = 8,67020 (USD)", RoHS=Yes, Stock 1=438, Supplier 1=Digi-Key, Width=0.197inch

## Via types
v1: diameter 0.45, hole 0.15, Top Layer to Bottom Layer, 469 vias
v2: diameter 0.5, hole 0.2, Top Layer to Bottom Layer, 128 vias
v3: diameter 0.475, hole 0.15, Top Layer to Bottom Layer, 15 vias
v4: diameter 5, hole 3, Top Layer to Bottom Layer, 3 vias
v5: diameter 0.6, hole 0.2, Top Layer to Bottom Layer, 1 vias